# Altium PCB IG-1.PCBDOC (part 3 of 3)
Units mil, origin at the board's own origin, x right, y up, seen from the top; angles counter-clockwise.
Board outline 2566.93 x 964.57 mil, 4 copper layers (Top, GND Plane, Mid1-Ver, Bottom), stack 61.6 mil thick; 41 components, 41 nets, 557 pads, 344 vias.
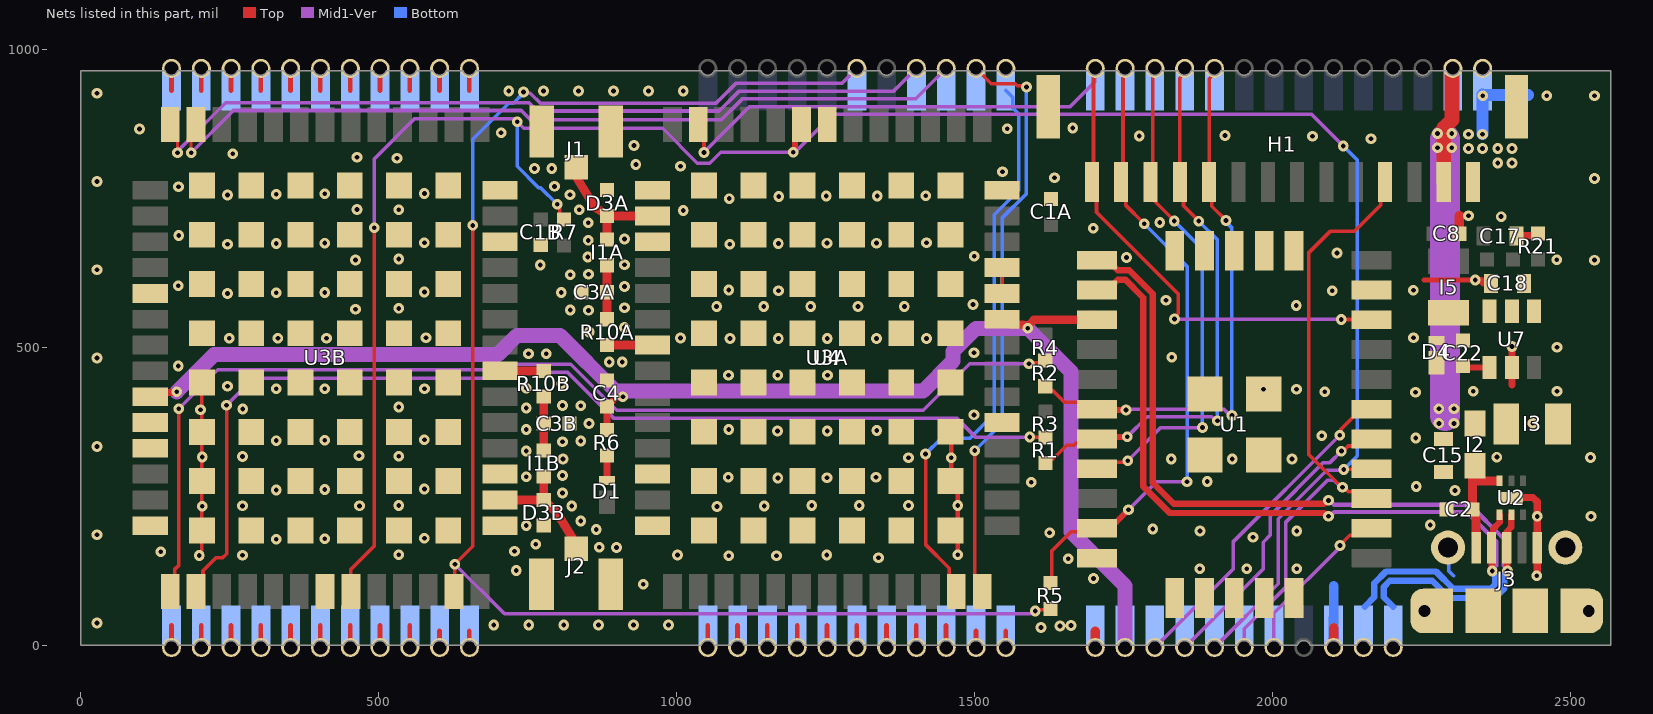
[diagram p4: the nets of this part, all layers, seen from the top]

## Via types
v1: diameter 18, hole 8, Top to Bottom, 344 vias

## Nets (pads, with @x,y where several pads share a name; then routed paths per layer and width w, separated by ;. In a path a pad name is that pad's centre, name@x,y a point inside that pad or via, vN(x,y) a via of type N, cw(c..) or ccw(c..) an arc to the next point about the centre after c; other vN are vias at no path point) (continued)
G6/Rx1/MOSI: H1.10 R2.1 U1.6 U4.10 | length 934.6
  Top w6: R2.1@1618.17,434.72 1625.98,426.91 1631.54,426.91 1650.41,408.04 1686.55,408.04 U1.6@1698.27,396.33 ; U4.10@1901.87,966.09 1901.87,959.6 1893.18,950.91 H1.10@1893.18,777.61 1897.72,773.07 1897.72,736.83 v1@1921.39,713.16
  Top w10: U1.6@1698.27,396.33 1699.85,394.75 v1(1753.51,394.75)
  Mid1-Ver w6: v1@1754,394.75 1755.75,396.5 1917.77,396.5 1928.74,385.54 v1(1931.44,385.54)
  Bottom w6: v1@1921.39,713.16 1921.39,710.32 1931.44,700.26 v1(1931.44,385.54)
  other v1: 1921.39,713.02
G7/Tx1/MISO: H1.11 R1.1 U1.7 U4.11 | length 921.9
  Top w6: R1.1@1625.27,312.47 1630.97,312.47 1654.08,335.58 1666.37,335.58 U1.7@1677.61,346.82 ; U4.11@1851.87,966.09 1851.87,959.6 1843.97,951.7 H1.11@1843.97,777.61 1850.2,771.38 1850.2,737.59 1875.78,712.01 v1(1875.78,711.87)
  Top w10: R1.1@1618.46,305.66 R1.1@1625.27,312.47 ; U1.7@1698.27,346.33 1701.85,349.92 v1(1755.64,349.92)
  Mid1-Ver w6: v1@1756.13,349.92 1756.13,350.41 1789.22,383.5 1897.65,383.5 1904.41,376.75 v1(1907.11,376.75)
  Bottom w6: v1@1875.85,711.94 1875.85,711.8 1907.11,680.54 v1(1907.11,376.75)
G8/C\S\/STROBE: H1.12 U1.8 U4.12 | length 853
  Top w6: U1.8@1698.27,296.33 1709.01,307.08 1751.48,307.08 1754.27,309.86 v1(1756.43,309.86) ; U4.12@1801.87,966.09 1798.31,962.54 1798.31,781.16 H1.12@1794.76,777.61 1802.57,769.8 1802.57,744.54 v1@1834.87,712.24
  Mid1-Ver w6: v1@1755.35,309.86 v1(1756.43,309.86) 1812.07,365.5 v1(1881.9,365.5)
  Bottom w6: v1(1834.79,712.17) 1881.9,665.07 v1(1881.9,365.5)
G9/S\P\I\_\E\N\/STROBE: H1.13 R5.1 U1.10 U4.13 | length 1066.2
  Top w6: R5.1@1629.31,107.2 1629.31,158.35 1661.47,190.51 1692.45,190.51 U1.10@1698.27,196.33 ; U4.13@1751.87,966.09 1748.71,962.93 1748.71,780.77 H1.13@1745.55,777.61 1752.98,770.17 1752.98,738.8 1784.35,707.43 v1(1784.35,707.29)
  Top w10: U1.10@1698.27,196.33 1709.01,207.08 1737.39,207.08 v1(1757.86,227.55)
  Mid1-Ver w6: v1(1757.86,227.55) 1804.8,274.48 v1(1856.15,274.48)
  Bottom w6: v1@1784.42,707.36 1856.15,635.63 v1(1856.15,274.48)
G10/CHIP_ERASE: U1.17 U4.17 | length 567.8
  Top w6: v1(2112.46,352.67) 2114.37,354.58 2114.37,362.63 2148.07,396.33 U1.17@2172.68,396.33
  Mid1-Ver w6: U4.17@1802.09,-3.54 1933.3,127.67 1933.3,173.52 v1(2112.46,352.67)
G11/SWDIO: U1.16 U4.18 | length 510.9
  Top w6: v1(2115.07,325.93) 2117.78,325.93 2126.44,334.58 2160.93,334.58 U1.16@2172.68,346.33
  Mid1-Ver w6: U4.18@1852.09,-3.54 1983.78,128.15 1983.78,173.08 1996.03,185.33 1996.03,217.86 2084.88,306.71 2095.85,306.71 v1(2115.07,325.93)
G13/DRDY/XSDA: H1.4 U1.14 U4.20 | length 1037.4
  Top w6: v1@2115.64,265.12 2060.68,320.09 2060.68,659.2 2096.05,694.57 2136.77,694.57 2181.01,738.81 2181.01,770.16 H1.4@2188.46,777.61 ; v1(2116.99,265.12) 2119.7,265.12 2126.74,258.08 2154.04,258.08 U1.14@2165.79,246.33
  Mid1-Ver w6: U4.20@1952.09,-3.54 1952.09,28.07 2022.03,98.02 2022.03,207.09 2092.34,277.39 2102.02,277.39 2114.29,265.12 v1(2116.99,265.12)
G14/SWCLK: U1.13 U4.21 | length 289.1
  Top w6: v1(2112.65,167.51) 2112.65,167.84 2129.39,184.58 2160.93,184.58 U1.13@2172.68,196.33
  Mid1-Ver w6: U4.21@2001.86,-3.54 2001.86,54.01 2112.65,164.8 v1(2112.65,167.51)
GND: C1A.2 C1B.2 C2.2 C3A.2 C3B.2 C4.2 C8.2 C15.2 C17.2 C18.2 D3A.2 D3B.2 D4.A H1.0 H1.1 J1.2 J1.3 J2.2 J2.3 J3.5 J3.6 J3.7 J3.8 J3.9 R21.1 U1.0 U1.11 U1.21 U1.23 U1.24 U2.7 U3A.1 U3A.3 U3A.12 U3A.14 U3A.32 U3A.37 U3A.38 U3A.41 U3A.48 U3A.55 U3B.1 U3B.3 U3B.12 U3B.14 U3B.32 U3B.37 U3B.38 U3B.41 U3B.48 U3B.55 U4.1 U4.15 U4.23 U4.37 U4.38 U4.39 U4.40 U4.41 U4.42 U4.43 U4.44 U4.45 U4.46 U4.47 U4.48 U4.49 U4.50 U4.51 U4.52 U4.53 U4.54 U4.55 U4.56 U4.57 U4.58 U4.59 U4.60 U4.61 U4.62 U4.63 U4.64 U4.65 U4.66 U4.67 U4.68 U4.69 U7.2 | length 2206.1
  Top w6: v1@203.08,146.57 U3B.55@203.08,192.92 ; U3B.55@203.08,275.6 v1@203.08,315.46 ; U3B.55@203.11,192.92 U3B.55@203.11,275.6 ; v1@203.11,315.92 U3B.55@203.11,421.2 ; U3A.37@1545.77,590.57 U3A.38@1545.77,633.88 ; v1@1655.85,144.52 v1(1656.62,145.29)
  Top w8: U4.59@151.86,6.3 151.86,33.86 ; 151.86,930.71 U4.58@151.86,958.27 ; U4.60@201.86,6.3 201.86,33.86 ; 201.86,930.71 U4.57@201.86,958.27 ; U4.61@251.86,6.3 251.86,33.86 ; 251.86,930.71 U4.56@251.86,958.27 ; U4.62@301.86,6.3 301.86,33.86 ; 301.86,930.71 U4.55@301.86,958.27 ; U4.63@351.86,6.3 351.86,33.86 ; 351.86,930.71 U4.54@351.86,958.27 ; U4.64@401.86,6.3 401.86,33.86 ; 401.86,930.71 U4.53@401.86,958.27 ; U4.65@451.86,6.3 451.86,33.86 ; 451.86,930.71 U4.52@451.86,958.27 ; U4.66@501.86,6.3 501.86,33.86 ; 501.86,930.71 U4.51@501.86,958.27 ; U4.67@551.86,6.3 551.86,33.86 ; 551.86,930.71 U4.50@551.86,958.27 ; U4.68@601.86,-3.54 601.86,24.02 ; 601.86,930.71 U4.49@601.86,958.27 ; U4.69@651.86,-3.54 651.86,24.02 ; 651.86,930.71 U4.48@651.86,958.27 ; U4.37@1051.86,6.3 1051.86,33.86 ; U4.38@1101.86,6.3 1101.86,33.86 ; U4.39@1151.86,6.3 1151.86,33.86 ; U4.40@1201.86,6.3 1201.86,33.86 ; U4.41@1251.86,6.3 1251.86,33.86 ; U4.42@1301.86,6.3 1301.86,33.86 ; U4.43@1351.86,6.3 1351.86,33.86 ; U4.44@1401.86,6.3 1401.86,33.86 ; U4.45@1451.86,6.3 1451.86,33.86 ; U3A.55@1459.15,358.29 1460.63,356.81 v1(1460.63,314.96) 1460.63,277.09 U3A.55@1459.15,275.61 1471.47,263.3 v1(1471.47,234.77) 1471.47,205.25 U3A.55@1459.15,192.94 1471.47,180.62 v1(1471.47,152.09) ; U4.46@1501.86,-3.54 1501.86,24.02 ; U4.47@1551.86,-3.54 1551.86,24.02
  Top w9: 2254.36,613.08 v1@2342.63,613.08
  Top w11.81: v1(2339.75,613.08) 2340.94,611.89 2349.91,611.89 2353.85,607.95
  Top w12: U2.7@2400.37,247.46 2400.83,247.92 2436.71,247.92 2443.74,240.89 v1@2443.74,124.74 ; 2401.09,437.33 U7.2@2401.09,466.22 2401.32,466.45 2401.32,501.41 v1(2401.55,501.65) ; C17.2@2408.96,686.69 2409.95,687.68 2443.41,687.68 R21.1@2444.4,688.66
  Top w16: U4.15@1701.86,-3.54 1701.86,24.02 ; U4.23@2101.86,-3.54 2101.95,29.11 ; C8.2@2313.17,690.61 2313.17,720.74 2313.9,720.74
  Bottom w6: J3.6@2294.09,164.05 J3.6@2299.83,158.31 ; J3.6@2295.12,154.69 2295.12,124.79 2303.32,116.59
  Bottom w16: U4.23@2101.86,-3.54 2102.14,99.62
  Bottom w20: v1(2351.99,857.77) 2351.86,857.9 2351.86,924.21 2352.73,923.34 2428.62,923.34
  other v1: 1611.17,30.12 1643.04,32.57 1661.21,33.33 692.81,34.21 751.43,34.21 810.06,34.21 868.69,34.21 927.31,34.21 985.94,34.21 26.95,37.55 943.48,102.5 1699.04,112.21 2443.02,116.68 730.73,125.64 1877.38,128.72 1956.12,128.72 2040.03,128.72 1338.29,147.05 1087.24,150.39 1167.37,150.39 198.67,150.97 271.37,151.38 533.27,152.08 1001.3,151.54 1251.69,151.7 133.94,157.09 727.64,157.8 898.68,164.33 869.68,164.64 763.19,169.69 327.7,178.19 409.3,178.87 576.39,179.64 1966.61,181.37 26.95,185.71 1625.52,188.99 1877.93,191.82 2040.03,191.83 864.88,194.47 1798.48,195.36 747.43,201.13 2264.13,202.07 838.94,208.53 2443.85,216.45 2533.91,216.45 203.54,233.25 1067.44,233.16 271.37,234.06 467.38,234.04 823.48,233.73 1146.75,233.7 533.27,234.76 1226.55,234.77 1306.11,234.77 1388.79,234.77 808.33,255.63 2305.75,259.95 327.7,260.87 409.3,261.55 576.39,262.32 2240.64,266.61 1594.71,273.57 1889.92,274.85 1169.53,280.93 1251.95,281.41 1086.27,282.16 1334.13,282.12 747.43,282.74 808.3,285.07 809.17,312.82 1829.51,312.73 1932.15,312.73 2032.06,312.73 1388.79,314.96 2533.21,315.23 203.54,315.92 2375.99,315.88 271.37,316.74 533.27,317.43 466.82,318.31 747.43,326.05 26.95,333.86 808.01,341.73 838.64,342.83 327.7,343.54 409.3,344.22 576.39,345 2239.91,347.97 2082.11,351.78 1169.06,359.53 1252.43,359.53 1335.33,360.61 747.43,362.38 1086.95,362.11 852.75,372.33 2436.11,372.81 1498.78,386.74 200.7,395.53 271.77,396.74 747.43,398.29 533.27,400.11 838.64,401.95 808.01,402.52 2086.99,425.46 2239.55,424.61 2336.54,426.26 2476.92,426.21 327.75,430.45 409.36,430.45 576.45,430.45 1984.52,429.64 2039.72,429.93 747.43,431.35 246.19,434.71 806.86,439 1086.65,453.06 1169.45,453.06 1252.77,453.06 163.22,468.68 886.74,475.58 908.5,475.59 26.95,482.02 1830.52,483.25 751.23,489.5 780.79,489.5 1498.56,491.03 2476.92,500.11 249.05,515.28 330.55,515.28 412.16,515.28 1089.03,515.05 1170.38,515.05 1252.26,515.05 1334.87,515.05 1419.06,515.05 579.25,516.05 1006.21,515.71 2236.13,516.08 852.88,525.63 912.31,533.28 851.72,562.11 821.09,562.68 460.63,563.81 533.27,565.47 912.31,566.33 1066.76,568.71 1145.81,568.71 1224.5,568.71 1303.99,568.71 1381.8,568.71 2039.31,570.23 1497.13,571.86 1820.91,579.08 246.19,590.41 327.7,591.58 409.3,592.25 806.15,592.24 576.39,593.03 1170.68,595.19 2099.8,594.89 1087.04,596.25 2235.91,595.74 912.31,602.25 163.22,603.28 821.09,621.8 851.72,622.89 26.95,630.18 770.88,638.13 912.31,638.58 460.63,646.47 2539.77,646.42 2476.53,646.94 533.27,648.14 1754.59,650.84 850.57,651.8 1498.95,652.92 2107.88,658.55 246.19,673.09 1088.89,673.1 327.7,674.25 1170.39,674.27 409.3,674.93 1252,674.95 1335.15,674.95 576.39,675.71 1419.09,675.72 851.43,679.56 912.31,681.88 164.3,687.61 1698.58,700.04 851.41,709 1810.14,709.39 2383.13,719.4 2328.2,720.86 1010.62,729.83 463.48,731.27 533.27,730.82 836.25,730.9 1088.01,749.61 1171.17,753.16 1250.83,754.03 1336.22,754.03 1417.73,754.42 246.19,755.77 820.8,756.09 327.7,756.93 409.3,757.61 576.39,758.39 163.91,769.63 794.85,770.15 26.95,778.34 2539.77,783.29 1633.54,784.73 1546.57,794.7 761.06,800.3 790.06,799.99 1005.97,803.79 931.26,806.77 2377.43,809.47 2401.22,809.47 530.47,817.49 463.48,818.92 254.76,825.02 2328.21,833.87 2351.99,833.87 2377.43,833.87 2401.22,833.87 928.18,838.93 2164.71,850.21 2066.71,854.11 1775.74,854.54 1919.71,855.41 2328.21,857.77 705.16,859.95 98.56,866.33 1554.25,866.93 1664.44,867.98 2352.15,922.13 2459.72,922.13 2539.77,922.13 26.95,926.5 717.78,930.36 776.41,930.36 835.03,930.36 893.66,930.36 952.29,930.36 1010.91,930.36
GPS1_ANT: D3A.1 I1A.1 J1.1 U3A.2 | length 206.3
  Top w14.9: J1.1@831.2,802.19 829.83,796.43 829.42,794.72 829.42,788.76 861.42,736.69 863.78,734.33 878.7,724.7 D3A.1@883.07,720.47 I1A.1@883.07,681.1 ; D3A.1@894.19,720.49 U3A.2@959.15,720.49
GPS1_RX2: U3A.26 U4.26 | length 961.1
  Top w6: v1(1417.32,321.05) 1417.32,169.29 1457.25,129.37 1457.25,102.32 U3A.26@1469,90.57
  Bottom w6: v1(1417.32,321.05) 1443.48,347.21 1491.43,347.21 1532.76,388.55 1532.76,722.56 1564.72,754.52 ; U4.26@1552.09,931.1 1563.83,919.35 1563.83,901.64 1573.61,891.86 1573.61,763.41 1566.52,756.32
GPS1_TX2: U3A.27 U4.27 | length 984.8
  Top w6: v1(1500,326.77) 1500,102.88 U3A.27@1512.3,90.57 ; U4.27@1502.09,968.11 1527.7,942.5 1567.83,942.5 1571.41,938.92 1584.7,938.92 v1(1586.61,937.01)
  Bottom w6: v1(1500,326.77) 1545.76,372.53 1545.76,717.18 1586.61,758.03 v1(1586.61,937.01)
GPS2.TIMEPULSE: R5.2 U3B.53 U4.31 | length 2522.5
  Top w6: U3B.53@626.3,90.56 627.55,91.81 v1(627.55,136.19) 657.48,166.12 v1(657.48,704.72) ; v1(1601.26,57.72) 1603.17,59.64 1625.05,59.64 R5.2@1629.02,63.61
  Mid1-Ver w6: v1(627.55,136.19) 710.91,52.83 1593.67,52.83 1598.55,57.72 v1(1601.26,57.72) ; v1(742.76,928.47) 744.67,926.56 754.23,926.56 771.15,909.64 1065.85,909.64 1099.32,943.11 1262.44,943.11 ; 1262.46,943.13 1277.1,943.13 U4.31@1302.09,968.11
  Bottom w6: v1(657.48,704.72) 657.48,849.28 717.83,909.64 725.59,909.64 742.76,926.8 v1(742.76,928.47)
GPS2_ANT: D3B.1 I1B.1 J2.1 U3B.2 | length 204
  Top w14.9: U3B.2@703.08,244.1 D3B.1@768.04,244.1 ; I1B.1@776.67,283.52 D3B.1@776.67,244.15 796.95,224.54 797.04,224.46 798.37,223.12 826.79,176.87 826.79,175.63 J2.1@831.03,162.41
GPS2_RX: R1.2 R3.2 U3B.43 | length 1782.4
  Top w6: U3B.43@193.23,90.56 204.95,102.27 204.95,125.09 226.74,146.88 237.59,146.88 244.68,153.97 244.68,402.53 v1(244.46,402.75) ; v1(1592.09,349.53) 1592.37,349.25 1618.18,349.25 R1.2@1618.46,348.97
  Mid1-Ver w6: v1(244.46,402.75) 290.16,448.45 723.19,448.45 733.24,458.5 816.59,458.5 893.65,381.44 1469.23,381.44 1501.14,349.53 v1(1592.09,349.53)
GPS2_RX2: U3B.26 U4.28 | length 1389.1
  Top w5: v1(185.04,826.77) 185.04,865.83 U3B.26@193.23,874.02
  Mid1-Ver w6: v1(185.04,826.77) 255.74,897.47 738.76,897.47 754.35,881.89 1074.87,881.89 1110.09,917.11 1273.21,917.11 ; 1273.23,917.13 1401.1,917.13 U4.28@1452.09,968.11
GPS2_TX: R2.2 R4.2 U3B.42 | length 1864.1
  Top w6: U3B.42@149.93,90.56 157.24,97.87 157.24,127.4 164.52,134.68 164.52,396.55 v1(164.11,396.96) ; v1(1590.92,472.65) 1592.84,474.56 1614.7,474.56 R2.2@1618.17,478.03
  Mid1-Ver w6: v1(164.11,396.96) 229.76,462.61 717.61,462.61 726.51,471.5 821.97,471.5 899.04,394.44 1413.44,394.44 1491.64,472.65 v1(1590.92,472.65)
GPS2_TX2: U3B.27 U4.29 | length 1364.7
  Top w5: U3B.27@149.93,874.02 163.17,860.77 162.04,859.64 v1(162.04,826.77)
  Mid1-Ver w6: v1(162.04,826.77) 162.04,829.23 243.29,910.47 751.93,910.47 765.77,896.64 1071.24,896.64 1104.71,930.11 1267.83,930.11 ; 1267.84,930.13 1364.1,930.13 U4.29@1402.09,968.11
GPS.TIMEPULSE: H1.14 U1.20 U3A.53 U4.14 | length 1599.9
  Top w6: U3A.53@1035.93,874.04 1045.55,864.41 v1(1045.55,827.18) ; U4.14@1701.87,966.09 1699.1,963.32 1699.1,780.38 H1.14@1696.33,777.61 1704.14,769.8 1704.14,726.75 1841.21,589.68 1841.21,556.2 1835.2,550.18 v1(1835.2,547.47) ; v1(2114.78,546.84) 2172.17,546.84 U1.20@2172.68,546.33
  Mid1-Ver w6: v1(1045.55,827.18) 1122.48,904.11 1278.6,904.11 ; 1278.61,904.13 1660.27,904.13 1701.37,945.23 1701.37,967.39 U4.14@1702.09,968.11 ; v1(1835.2,547.47) 1835.27,547.4 v1@2114.78,547.4
GPS_RESET_N: R7.2 U1.15 U3A.49 U3B.49 U4.19 | length 3757
  Top w6: U3B.49@453.08,90.56 453.08,127.41 492.26,166.59 492.26,700.65 v1(492.13,700.79) ; v1(799.21,740.16) 799.21,737.45 803.21,733.45 803.21,722.38 R7.2@811.02,714.57 ; v1(2119.1,295.21) 2171.56,295.21 U1.15@2172.68,296.33
  Top w10: v1(1195.52,827.44) 1195.52,829.6 1198.41,832.48 1198.41,863.29 U3A.49@1209.15,874.04
  Mid1-Ver w6: v1(492.13,700.79) 492.13,816.18 559.29,883.34 v1@732.14,883.34 ; v1@732.49,883.34 732.49,878.99 v1(732.14,878.64) 743.32,867.46 976.1,867.46 1034.38,809.18 1055.21,809.18 1073.46,827.44 v1(1195.52,827.44) 1198.23,827.44 1261.91,891.11 1283.98,891.11 ; 1284,891.13 2065.08,891.13 v1(2118.26,837.95) ; U4.19@1902.09,-3.54 2009.03,103.4 2009.03,212.48 2090.26,293.71 2117.6,293.71 v1(2119.1,295.21)
  Bottom w6: v1(732.14,878.64) 732.14,803.76 767.86,768.04 771.33,768.04 v1(799.21,740.16) ; v1(2118.26,837.95) 2141.75,814.46 2141.75,317.86 v1(2119.1,295.21)
NetC22_1: C22.1 U7.1 | length 48.3
  Top w10: C22.1@2318.59,473.51 2318.59,473.26 2325.63,466.22 U7.1@2363.69,466.22
NetD1_C: D1.C R6.1 | length 41.3
  Top w12: D1.C@882.78,276.99 R6.1@882.78,318.33
SW: C22.2 D4.C I5.1 U7.6
USB.D_N: J3.2 U1.2 U2.1 U4.24 | length 1527.3
  Top w10.7: 1782.84,583.41 1782.84,266.5 1827.28,222.06 2086.02,222.06 2091.53,216.55 v1(2093.51,216.55)
  Top w10.73: U1.2@1677.61,596.82 1723.37,596.82 1740.01,613.47 1752.79,613.47 1782.82,583.44 ; v1(2368.15,124.69) 2367.54,125.31 2367.54,163.44 J3.2@2366.92,164.05 2369.43,166.56 2369.43,195.28 2380.68,206.53 U2.1@2380.68,218.92
  Mid1-Ver w6.97: v1(2093.51,216.55) 2095.75,216.55 2103.1,223.91 2325.5,223.91 2374.96,174.45 2374.96,134.29 2368.15,127.48 v1(2368.15,124.69)
  Bottom w10.7: U4.24@2154.16,64.83 2170.41,81.09 2170.41,104.47 2189.9,123.96 2273.92,123.96 2302.73,95.15 2365.9,95.15 2373.09,102.34 2373.09,117.77 2368.15,122.72 v1(2368.15,124.69)
USB.D_P: J3.3 U1.1 U2.2 U4.25 | length 1544.7
  Top w10.7: 1798.54,589.97 1798.54,273 1833.78,237.76 2086.02,237.76 2091.53,243.27 v1(2093.51,243.27)
  Top w10.73: U1.1@1677.61,646.82 1722.38,646.82 1740.01,629.2 1759.31,629.2 1798.54,589.97 ; J3.3@2392.51,164.05 2392.51,190.63 2400.37,198.48 U2.2@2400.37,218.92 ; J3.3@2393.13,164.05 2393.13,125.31 v1(2393.74,124.69)
  Mid1-Ver w6.97: v1(2093.51,243.27) 2095.33,243.27 2102.72,235.88 2330.46,235.88 2386.93,179.41 2386.93,134.29 2393.74,127.48 v1(2393.74,124.69)
  Bottom w10.7: U4.25@2202.04,64.83 2186.11,80.76 2186.11,97.97 2196.4,108.26 2267.42,108.26 2296.22,79.45 2372.41,79.45 2388.79,95.84 2388.79,117.77 2393.74,122.72 v1(2393.74,124.69)
USB.VBUS: C2.1 I2.2 J3.1 U2.6 | length 137.1
  Top w15: I2.2@2334.93,287.48 C2.1@2334.93,228.32 2339.24,224.01 2339.24,217.21 2341.23,215.23 J3.1@2341.23,186.89 ; 2344.19,275.93 U2.6@2378.11,275.93
V_ANTA: C3A.1 I1A.2 R10A.2 | length 92.2
  Top w14.9: R10A.2@883.07,547.24 883.07,590.55 881.1,592.52 883.07,594.49 I1A.2@883.07,637.79
V_ANTB: C3B.1 I1B.2 R10B.2 | length 92.2
  Top w14.9: I1B.2@776.67,326.83 776.67,370.14 778.63,372.11 776.67,374.08 R10B.2@776.67,417.38
VBAT: C4.1 R6.2 U1.3 U3A.36 U3B.36 U4.16 | length 2454.7
  Top w12: U3B.36@116.46,417.33 123.37,424.24 159.74,424.24 v1(160.89,425.39) ; R6.2@882.78,361.63 C4.1@882.78,401 898.53,416.75 v1@908.87,416.75 ; v1@905.83,416.17 908.3,416.17 v1@908.87,416.75 ; v1(909.45,417.32) v1@908.87,416.75
  Top w14: U3A.36@1551.14,546.6 1559.22,538.52 1581.17,538.52 1587.69,532 v1(1588.77,532) 1588.77,533.08 1590.77,535.08 1590.77,537.93 1598.98,546.14 1691.57,546.14 U1.3@1695.02,549.58
  Top w25: U3A.36@1545.77,547.27 U3A.36@1549.02,550.51 ; U1.3@1695.02,549.58 U1.3@1698.27,546.33
  Mid1-Ver w25: v1(160.89,425.39) 223.7,488.2 699.89,488.2 731.58,519.89 804,519.89 897.32,426.56 909.45,426.56 1413.04,426.56 1463.5,477.02 1463.5,493.44 1502.06,532 v1(1588.77,532) 1661.47,459.3 1661.47,190.51 1752.09,99.9 U4.16@1752.09,-3.54
VCC_RFA: R10A.1 U3A.7 | length 76.1
  Top w14.9: R10A.1@883.07,503.96 U3A.7@959.15,503.96
VCC_RFB: R10B.1 U3B.7 | length 73.6
  Top w14.9: U3B.7@703.08,460.64 R10B.1@776.67,460.64
VIN: C15.1 H1.2 I2.1 I3.1 U4.2 | length 659.6
  Top w25: H1.2@2286.88,777.61 2286.88,867.85 2300.88,881.84 2300.88,965.1 U4.2@2301.87,966.09
  Mid1-Ver w50: 2288.91,384.72 2288.91,835.15 2288.91,849.61
  other v1: 2278.67,372.5 2304.1,372.5 2278.67,397.02 2304.1,397.02 2276.35,834.99 2300.14,834.99 2276.35,858.89 2300.14,858.89
VIN_P: C18.1 I3.2 U7.4 U7.5
pads on no net: J3.4 U2.3 U2.4 U2.5 U3A.4 U3A.5 U3A.6 U3A.8 U3A.9 U3A.10 U3A.11 U3A.13 U3A.15 U3A.16 U3A.17 U3A.18 U3A.19 U3A.20 U3A.21 U3A.22 U3A.23 U3A.24 U3A.25 U3A.28 U3A.29 U3A.30 U3A.31 U3A.35 U3A.39 U3A.40 U3A.44 U3A.45 U3A.46 U3A.47 U3A.50 U3A.51 U3A.52 U3A.54 U3B.4 U3B.5 U3B.6 U3B.8 U3B.9 U3B.10 U3B.11 U3B.13 U3B.15 U3B.16 U3B.17 U3B.18 U3B.19 U3B.20 U3B.21 U3B.22 U3B.23 U3B.24 U3B.25 U3B.28 U3B.29 U3B.30 U3B.31 U3B.35 U3B.39 U3B.40 U3B.44 U3B.45 U3B.46 U3B.47 U3B.50 U3B.51 U3B.52 U3B.54 U4.4 U4.32 U4.33 U4.34 U4.35 U4.36

## Polygon pours and split planes (outlines as drawn)
GND on Top "NONET_L-01_P-001" (solid, pour order 12): 2327.78,954.72 2327.78,748.84 2301.36,722.42 2301.36,678.8 2553.66,678.8 2554.63,679.78 2554.63,954.72
GND on Top "GND_L01_P010" (solid, remove dead copper, pour order 10): 16.29,20.35 16.29,944.88 2548.97,944.88 2548.97,20.35
+3.3V on Mid1-Ver "+3.3V_L03_P009" (solid, remove dead copper, pour order 9): 15.45,9.84 15.45,954.72 2550.58,954.72 2550.58,9.84
GND on Bottom "GND_L04_P013" (solid, remove dead copper, pour order 13): 16.29,20.35 16.29,944.88 2548.97,944.88 2548.97,20.35
GND on GND Plane (split plane): 902 vertices, not listed, extent 10.09,10.09 2556.84,954.48

## Other copper
Top:
  region net VIN: 2270.57,336.25 2408.42,336.25 2408.42,406.22 2357.24,406.22 2270.57,406.22
  pour cut-out: 851.9,815.31 851.9,777.97 879.35,777.97 879.35,815.31
  pour cut-out: 898.24,758.76 898.24,729.52 925.7,729.52 925.7,758.76
  pour cut-out: 1637.62,675.11 1637.62,645.87 1653.59,645.87 1654.03,645.43 1654.37,645.77 1654.37,675.11
  pour cut-out: 1581.9,597.03 1581.9,567.78 1597.87,567.78 1598.31,567.34 1598.64,567.68 1598.64,597.03
  pour cut-out: 781.18,185.52 781.18,148.19 808.64,148.19 808.64,185.52
  region net +3.3V: 2329.55,631.13 2322.8,624.38 2219.33,624.38 2213.03,631.13 2143.8,631.13 2143.8,661.79 2225.86,743.86 2225.86,753 2249.48,753 2249.48,740.91 2291.52,698.88 2291.52,672.55 2332.93,672.55 2332.93,701.46 2371.65,701.46 2371.65,636.72 2366.07,631.13
  region net VIN_P: 2500.34,406.15 2486.38,406.15 2486.38,337.53 2557.86,337.53 2557.86,623.7 2450.3,623.7 2419.16,623.7 2418.91,623.37 2414.34,623.48 2414.56,609.66 2389.28,584.38 2389.28,521.02 2500.34,521.02
  region net SW: 2260.43,602.42 2260.43,507.62 2375.59,507.62 2375.59,576.83 2329.33,576.83 2329.33,602.42
Mid1-Ver:
  region net +3.3V: 2234.62,734.78 2234.62,671.93 2224.77,662.08 2169.31,662.08 2157.79,673.6 2218.98,734.78
Bottom:
  region net +3.3V: 2234.62,734.78 2234.62,671.93 2224.77,662.08 2169.31,662.08 2157.79,673.6 2218.98,734.78

## Silkscreen, mask and mechanical layers (free items; w line width, h text height)
Silkscreen Top:
  region: 2035.16,390.13 cw(c1938.55,390.13) 2035.16,390.27 cw(c2030.93,390.26) 2035.16,390.26 cw(c2030.93,390.26) 2026.71,390.26 ccw(c1938.55,390.13) 2026.71,390.13 cw(c2030.93,390.13)
  region: 1934.4,344.71 1934.4,325.1 1942.81,325.1 1942.81,346
  region: 1938.75,458.22 1926.23,437.03 1934.45,433.41 1934.45,426.06 1942.79,427.07 1942.79,433.43 1950.83,436.85
  region: 1987.08,420.74 1965.89,433.27 1962.27,425.04 1961.29,425.04 1962.29,416.7 1965.71,408.67
  region: 1961.34,425.02 1952.66,424.73 1941.39,423.71 1935.91,422.97 1926.56,421.18 1921.44,419.86 1914.97,417.63 1910.78,415.48 1908.57,414.08 1907.02,412.85 1905.35,411.25 1904.27,409.65 1903.38,408.22 1902.85,406.8 1902.51,405.36 1902.39,403.99 1902.39,402.39 1902.57,401.26 1903.16,399.44 1903.86,397.86 1904.94,396.39 1906.74,394.48 1908.44,393.06 1910.46,391.66 1913.57,390.03 1917.02,388.43 1921.03,386.88 1924.96,385.57 1928.65,384.42 1932.26,383.43 1932.26,392.2 1926.76,393.76 1921.57,395.56 1917.27,397.4 1913.94,399.18 1912.63,400.24 1911.37,401.62 1910.92,402.54 1910.74,403.43 1910.74,404.41 1911.25,405.39 1912.18,406.42 1913.41,407.41 1914.74,408.25 1916.5,409.15 1918.55,410.03 1920.29,410.64 1922.21,411.32 1924.73,411.99 1927.62,412.8 1931.74,413.68 1936.07,414.45 1940.26,415.06 1946.03,415.71 1953.11,416.41 1962.26,416.92
  region: 1934.4,410.84 1934.4,359.9 1942.81,361.18 1942.81,412.13
  region: 1909.85,346.75 1922.19,347.09 1932.95,347.98 1941.28,349.1 1950.63,350.9 1955.75,352.21 1962.22,354.44 1966.41,356.59 1968.62,358 1970.17,359.22 1971.84,360.82 1972.92,362.42 1973.81,363.86 1974.34,365.28 1974.68,366.71 1974.8,368.08 1974.8,369.68 1974.62,370.81 1974.03,372.63 1973.33,374.21 1972.25,375.68 1970.45,377.59 1968.75,379.01 1966.73,380.41 1963.62,382.05 1960.17,383.65 1956.16,385.19 1952.23,386.5 1948.54,387.65 1944.93,388.64 1944.93,379.87 1950.43,378.31 1955.63,376.51 1959.92,374.68 1963.25,372.9 1964.56,371.84 1965.82,370.45 1966.27,369.54 1966.45,368.64 1966.45,367.67 1965.94,366.68 1965.01,365.65 1963.79,364.67 1962.46,363.82 1960.69,362.92 1958.65,362.04 1956.9,361.43 1954.98,360.75 1952.46,360.08 1949.57,359.27 1945.45,358.39 1941.12,357.62 1936.93,357.01 1931.16,356.36 1924.08,355.66 1909.85,355
  lines w12: 1643.52,303.09 1643.52,393.87 ; 1643.73,432.43 1643.73,524.43
  text "1" at 742.31,738.41 h78.74
  text "IG-1.2.0-G2" at 2557.83,630.43 h65 r90
  text "2" at 854.9,152.29 h78.74
  text "1  |  2" at 1639.43,147.72 h40 r90
Silkscreen Bottom:
  text "'.PcbRevision'" at 2371.53,279.94 h80
Dimensions:
  drawing of 295 lines, arcs and shapes, not listed
  text "Layer" at 3112.02,1385.56 h60
  text "Name" at 3521.93,1385.56 h60
  text "Material" at 4691.6,1385.56 h60
  text "Thickness" at 5551.37,1385.56 h60
  text "Constant" at 6201.2,1385.56 h60
  text "Board Layer Stack" at 6771.06,1385.56 h60
  text "Silkscreen Top" at 3521.93,1265.56 h60
  text "Solder Mask Top" at 3521.93,1145.56 h60
  text "Solder Resist" at 4691.6,1145.56 h60
  text "0.40mil" at 5551.37,1145.56 h60
  text "3.5" at 6201.2,1145.56 h60
  text "1" at 3112.02,1025.56 h60
  text "Top" at 3521.93,1025.56 h60
  text "2.10mil" at 5551.37,1025.56 h60
  text "Dielectric1" at 3521.93,905.56 h60
  text "PP-006" at 4691.6,905.56 h60
  text "8.00mil" at 5551.37,905.56 h60
  text "4.1" at 6201.2,905.56 h60
  text "2" at 3112.02,785.56 h60
  text "GND Plane" at 3521.93,785.56 h60
  text "0.70mil" at 5551.37,785.56 h60
  text "Dielectric3" at 3521.93,665.56 h60
  text "Core-009" at 4691.6,665.56 h60
  text "40.00mil" at 5551.37,665.56 h60
  text "4.5" at 6201.2,665.56 h60
  text "3" at 3112.02,545.56 h60
  text "Mid1-Ver" at 3521.93,545.56 h60
  text "0.70mil" at 5551.37,545.56 h60
  text "Dielectric2" at 3521.93,425.56 h60
  text "PP-006" at 4691.6,425.56 h60
  text "8.00mil" at 5551.37,425.56 h60
  text "4.1" at 6201.2,425.56 h60
  text "4" at 3112.02,305.56 h60
  text "Bottom" at 3521.93,305.56 h60
  text "2.10mil" at 5551.37,305.56 h60
  text "Solder Mask Bottom" at 3521.93,185.56 h60
  text "Solder Resist" at 4691.6,185.56 h60
  text "0.40mil" at 5551.37,185.56 h60
  text "3.5" at 6201.2,185.56 h60
  text "Silkscreen Bottom" at 3521.93,65.56 h60
Drill Drawing:
  circle w5: c5083.63,5361.51 r19.44
  lines w5: 5029.57,5053.31 7278.97,5053.31 ; 5029.57,5403.31 7278.97,5403.31 ; 5348.24,4965.81 5348.24,5490.81 ; 5752.63,4965.81 5752.63,5490.81 ; 6534.9,4965.81 6534.9,5490.81 ; 6827.33,4965.81 6827.33,5490.81 ; 5029.57,4965.81 7278.97,4965.81 7278.97,5490.81 5029.57,5490.81 5029.57,4965.81 ; 5064.18,5079.56 5103.07,5079.56 5103.07,5118.45 5064.18,5118.45 5064.18,5079.56 ; 5064.18,5176.78 5073.91,5176.78 5083.63,5167.06 5093.35,5176.78 5103.07,5176.78 5093.35,5186.51 5103.07,5196.23 5093.35,5196.23 5083.63,5205.95 5073.91,5196.23 5064.18,5196.23 5073.91,5186.51 5064.18,5176.78 ; 5064.18,5293.45 5103.07,5293.45 5083.63,5254.56 5064.18,5293.45
  text "Symbol" at 5082.07,5429.56 h42
  text "Hit Count" at 5374.49,5429.56 h42
  text "Finished Hole Size" at 5778.88,5429.56 h42
  text "Plated" at 6561.15,5429.56 h42
  text "Hole Type" at 6853.58,5429.56 h42
  text "2" at 5374.49,5342.06 h35
  text "19.69mil (0.500mm)" at 5778.88,5342.06 h35
  text "PTH" at 6561.15,5342.06 h35
  text "Slot" at 6853.58,5342.06 h35
  text "2" at 5374.49,5254.56 h35
  text "33.47mil (0.850mm)" at 5778.88,5254.56 h35
  text "PTH" at 6561.15,5254.56 h35
  text "Round" at 6853.58,5254.56 h35
  text "69" at 5374.49,5167.06 h35
  text "23.00mil (0.584mm)" at 5778.88,5167.06 h35
  text "PTH" at 6561.15,5167.06 h35
  text "Round" at 6853.58,5167.06 h35
  text "344" at 5374.49,5079.56 h35
  text "8.00mil (0.203mm)" at 5778.88,5079.56 h35
  text "PTH" at 6561.15,5079.56 h35
  text "Round" at 6853.58,5079.56 h35
  text "417 Total" at 5374.49,4992.06 h35
  text "Slot definitions :" at 5082.07,4909.16 h35
  text "Routed Path Length" at 5682.13,4909.16 h35
  text "= Calculated from tool start centre position to tool end centre position." at 6323.02,4909.16 h35
  text "Hole Length" at 5682.13,4852.51 h35
  text "= Routed Path Length + Tool Size = Slot length as defined in the PCB layout" at 6083.93,4852.51 h35
Board Outline:
  lines w5: 2566.7,964.57 2362.8,964.57 cw(c2351.86,968.11) 2340.92,964.57 2312.8,964.57 cw(c2301.86,968.11) 2290.92,964.57 2262.8,964.57 cw(c2251.86,968.11) 2240.92,964.57 2212.8,964.57 cw(c2201.86,968.11) 2190.92,964.57 2162.8,964.57 cw(c2151.86,968.11) 2140.92,964.57 2112.8,964.57 cw(c2101.86,968.11) 2090.92,964.57 2062.8,964.57 cw(c2051.86,968.11) 2040.92,964.57 2012.8,964.57 cw(c2001.86,968.11) 1990.92,964.57 1962.8,964.57 cw(c1951.86,968.11) 1940.92,964.57 1912.8,964.57 cw(c1901.86,968.11) 1890.92,964.57 1862.8,964.57 cw(c1851.86,968.11) 1840.92,964.57 1812.8,964.57 cw(c1801.86,968.11) 1790.92,964.57 1762.8,964.57 cw(c1751.86,968.11) 1740.92,964.57 1712.8,964.57 cw(c1701.86,968.11) 1690.92,964.57 1562.8,964.57 cw(c1551.86,968.11) 1540.92,964.57 1512.8,964.57 cw(c1501.86,968.11) 1490.92,964.57 1462.8,964.57 cw(c1451.86,968.11) 1440.92,964.57 1412.8,964.57 cw(c1401.86,968.11) 1390.92,964.57 1362.8,964.57 cw(c1351.86,968.11) 1340.92,964.57 1312.8,964.57 cw(c1301.86,968.11) 1290.92,964.57 1262.8,964.57 cw(c1251.86,968.11) 1240.92,964.57 1212.8,964.57 cw(c1201.86,968.11) 1190.92,964.57 1162.8,964.57 cw(c1151.86,968.11) 1140.92,964.57 1112.8,964.57 cw(c1101.86,968.11) 1090.92,964.57 1062.8,964.57 cw(c1051.86,968.11) 1040.92,964.57 662.8,964.57 cw(c651.86,968.11) 640.92,964.57 612.8,964.57 cw(c601.86,968.11) 590.92,964.57 562.8,964.57 cw(c551.86,968.11) 540.92,964.57 512.8,964.57 cw(c501.86,968.11) 490.92,964.57 462.8,964.57 cw(c451.86,968.11) 440.92,964.57 412.8,964.57 cw(c401.86,968.11) 390.92,964.57 362.8,964.57 cw(c351.86,968.11) 340.92,964.57 312.8,964.57 cw(c301.86,968.11) 290.92,964.57 262.8,964.57 cw(c251.86,968.11) 240.92,964.57 212.8,964.57 cw(c201.86,968.11) 190.92,964.57 162.8,964.57 cw(c151.86,968.11) 140.92,964.57 0,964.57 0,0 140.92,0 cw(c151.86,-3.54) 162.8,0 190.92,0 cw(c201.86,-3.54) 212.8,0 240.92,0 cw(c251.86,-3.54) 262.8,0 290.92,0 cw(c301.86,-3.54) 312.8,0 340.92,0 cw(c351.86,-3.54) 362.8,0 390.92,0 cw(c401.86,-3.54) 412.8,0 440.92,0 cw(c451.86,-3.54) 462.8,0 490.92,0 cw(c501.86,-3.54) 512.8,0 540.92,0 cw(c551.86,-3.54) 562.8,0 590.92,0 cw(c601.86,-3.54) 612.8,0 640.92,0 cw(c651.86,-3.54) 662.8,0 1012.8,0 1040.92,0 cw(c1051.86,-3.54) 1062.8,0 1090.92,0 cw(c1101.86,-3.54) 1112.8,0 1140.92,0 cw(c1151.86,-3.54) 1162.8,0 1190.92,0 cw(c1201.86,-3.54) 1212.8,0 1240.92,0 cw(c1251.86,-3.54) 1262.8,0 1290.92,0 cw(c1301.86,-3.54) 1312.8,0 1340.92,0 cw(c1351.86,-3.54) 1362.8,0 1390.92,0 cw(c1401.86,-3.54) 1412.8,0 1440.92,0 cw(c1451.86,-3.54) 1462.8,0 1490.92,0 cw(c1501.86,-3.54) 1512.8,0 1540.92,0 cw(c1551.86,-3.54) 1562.8,0 1690.92,0 cw(c1701.86,-3.54) 1712.8,0 1740.92,0 cw(c1751.86,-3.54) 1762.8,0 1790.92,0 cw(c1801.86,-3.54) 1812.8,0 1840.92,0 cw(c1851.86,-3.54) 1862.8,0 1890.92,0 cw(c1901.86,-3.54) 1912.8,0 1940.92,0 cw(c1951.86,-3.54) 1962.8,0 1990.92,0 cw(c2001.86,-3.54) 2012.8,0 2040.92,0 cw(c2051.86,-3.54) 2062.8,0 2090.92,0 cw(c2101.86,-3.54) 2112.8,0 2140.92,0 cw(c2151.86,-3.54) 2162.8,0 2190.92,0 cw(c2201.86,-3.54) 2212.8,0 2566.93,0 2566.93,964.57

## Text inside footprints (layer, text, board x,y; h text height)
U1: Silkscreen Top "1" at 1747.4,634.52 h40; Silkscreen Top "11" at 1747.4,134.52 h40; Silkscreen Top "12" at 2086.06,134.52 h40; Silkscreen Top "22" at 2085,634.52 h40
U4: Silkscreen Bottom "15" at 1688.98,78.74 h45 r270; Silkscreen Bottom "25" at 2188.98,78.74 h45 r270; Silkscreen Bottom "14" at 1688.98,846.46 h45 r270; Silkscreen Bottom "1" at 2338.58,866.14 h45 r270; Silkscreen Bottom "IS-IG-1.2" at 2358.66,687.58 h150; Silkscreen Bottom "INERTIAL" at 1462.85,235.94 h80; Silkscreen Bottom "SENSE" at 1130.65,235.87 h80; Silkscreen Bottom "2024" at 2322.12,229.17 h50; Silkscreen Bottom "C" at 2357.99,234.96 h30; Silkscreen Bottom "36" at 1065.2,885.83 h45 r90; Silkscreen Bottom "26" at 1565.2,885.83 h45 r90; Silkscreen Bottom "37" at 1038.98,78.74 h45 r270; Silkscreen Bottom "47" at 1538.98,78.74 h45 r270; Silkscreen Bottom "59" at 138.98,78.74 h45 r270; Silkscreen Bottom "69" at 638.98,78.74 h45 r270; Silkscreen Bottom "58" at 165.2,885.83 h45 r90; Silkscreen Bottom "48" at 665.2,885.83 h45 r90